# Altium PCB VHF_AMP.PCBDOC (part 5 of 7)
Units mm, origin at the board's own origin, x right, y up, seen from the top; angles counter-clockwise.
Board outline 222.47 x 100.01 mm, 4 copper layers (Top Layer, Int1 (GND), Int2 (PWR), Bottom Layer), stack 1.508 mm thick; 513 components, 284 nets, 1695 pads, 984 vias.
Unrouted connection lines stored in the file: 110.
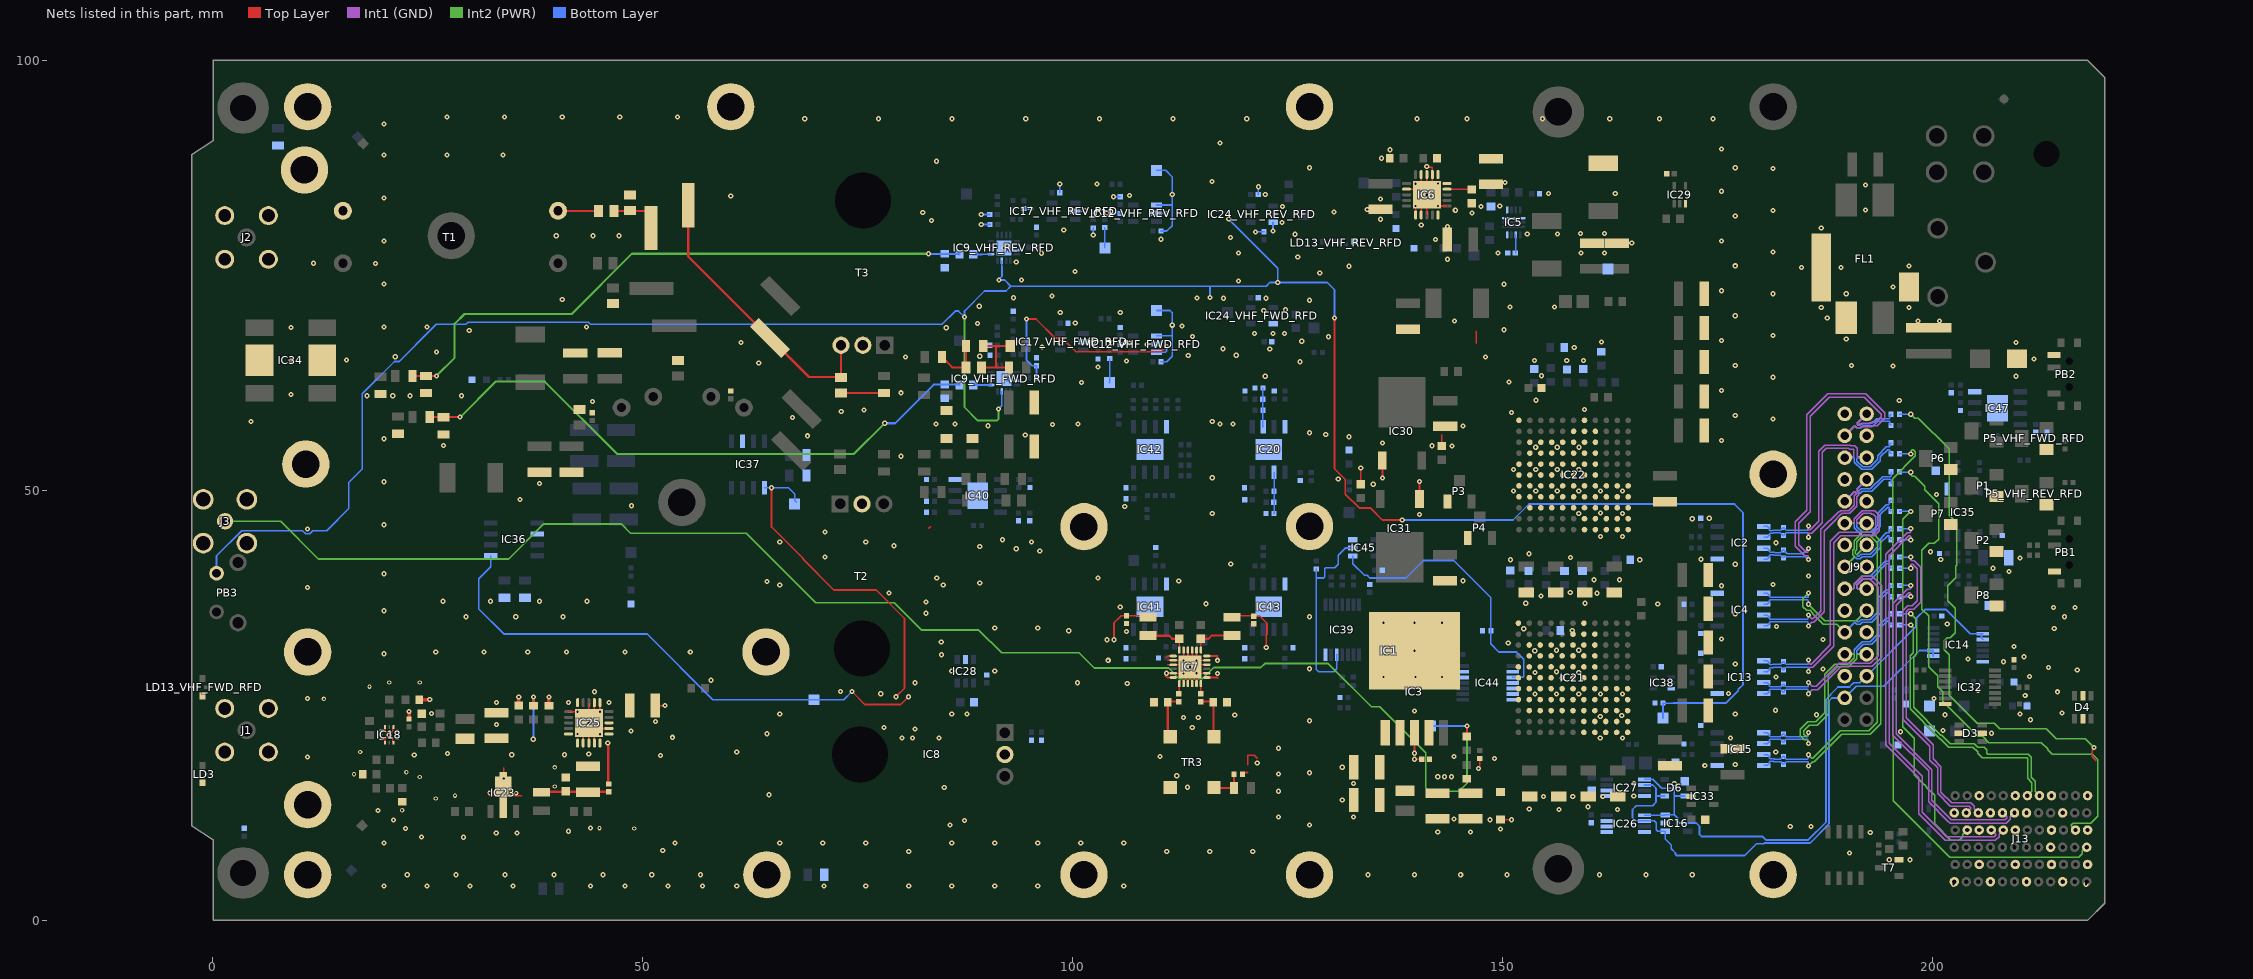
[diagram p5: the nets of this part, all layers, seen from the top]

## Via types
v1: diameter 0.6, hole 0.25, Top Layer to Bottom Layer, tented both sides, 878 vias
v2: diameter 0.6, hole 0.25, Top Layer to Bottom Layer, tented top, 61 vias
v3: diameter 0.5, hole 0.25, Top Layer to Bottom Layer, tented top, 27 vias
v4: diameter 1, hole 0.5, Top Layer to Bottom Layer, tented both sides, 16 vias
v5: diameter 0.5, hole 0.25, Top Layer to Bottom Layer, tented both sides, 2 vias

## Nets (pads, with @x,y where several pads share a name; then routed paths per layer and width w, separated by ;. In a path a pad name is that pad's centre, name@x,y a point inside that pad or via, vN(x,y) a via of type N, cw(c..) or ccw(c..) an arc to the next point about the centre after c; other vN are vias at no path point) (continued)
BP_IO.LVDS_N4: J13.I4 R243.1 | length 47.2
  Int1 (GND) w0.152: v1(197.5,44.24) 197.488,44.252 197.488,44.6 197.399,44.689 197.273,44.689 195.002,42.418 195.002,20.601 198.853,16.75 198.853,12.574 201.71,9.717 205.729,9.717 205.731,9.715 207.188,9.715 207.365,9.892 207.365,10.018 206.89,10.493 J13.I4@206.866,10.493
  Bottom Layer w0.152: R243.1@196.17,44.24 v1(197.5,44.24)
BP_IO.LVDS_N5: J13.K5 R9.1 | length 36.8
  Int1 (GND) w0.152: v1(197.5,40.94) 197.512,40.952 197.512,41.3 197.601,41.389 197.727,41.389 198.244,40.872 198.244,37.151 197.66,36.568 197.132,36.568 196.572,36.008 196.572,23.376 199.698,20.25 199.698,18.635 200.616,17.718 200.616,14.753 202.098,13.271 204.288,13.271 204.465,13.094 204.465,12.968 203.99,12.493 J13.K5@203.966,12.493
  Bottom Layer w0.152: R9.1@196.17,40.94 v1(197.5,40.94)
BP_IO.LVDS_N6: J13.H5 R247.1 | length 39
  Int1 (GND) w0.152: v1(197.5,37.64) 197.488,37.652 197.488,38 197.399,38.089 197.273,38.089 195.8,36.616 195.8,21.703 199.971,17.532 199.971,13.935 202.078,11.827 202.173,11.732 ccw(c202.281,11.84) 202.278,11.688 203.19,11.671 ccw(c203.193,11.823) 203.193,11.671 208.444,11.671 208.665,11.892 208.665,12.018 208.19,12.493 J13.H5@208.166,12.493
  Bottom Layer w0.152: R247.1@196.17,37.64 v1(197.5,37.64)
BP_IO.LVDS_N7: J13.F6 R248.1 | length 32.2
  Int2 (PWR) w0.152: v1(197.5,34.34) v1(197.5,34.34) 197.811,34.03 197.811,31.133 197.454,30.776 197.454,24.603 199.01,23.046 199.01,22.976 200.851,21.135 200.922,21.135 201.905,20.151 204.726,20.151 205.294,19.583 205.294,19.408 205.789,18.913 210.971,18.913 211.095,18.789 211.095,16.492 211.565,16.023 211.565,14.992 J13.F6@211.066,14.493
  Bottom Layer w0.152: R248.1@196.17,34.34 v1(197.5,34.34)
BP_IO.LVDS_P0: J13.D3 R3.1 | length 59.4
  Top Layer w0.152: v1(218.793,20.108) 218.793,20.008 218.58,19.795 218.58,19.045 219.078,18.547
  Int2 (PWR) w0.152: v1(197.5,58.84) 197.949,58.391 198.403,58.391 201.952,54.843 201.952,47.095 202.847,46.2 202.847,41.258 202.747,41.158 202.747,41.133 202.746,39.853 201.808,38.914 201.808,37.151 202.68,36.279 202.68,33.434 202.111,32.865 201.772,32.865 201.389,32.482 201.389,31.463 201.981,30.871 201.981,26.159 205.233,22.907 207.231,22.907 207.467,22.672 207.467,22.66 207.876,22.252 212.924,22.252 213.257,22.252 214.405,21.104 217.796,21.104 v1(218.793,20.108)
  Bottom Layer w0.152: R3.1@196.17,58.84 v1(197.5,58.84)
BP_IO.LVDS_P1: J13.A3 R4.1 | length 69.9
  Int2 (PWR) w0.152: v1(197.5,54.24) 197.583,54.323 197.583,54.6 197.672,54.689 197.798,54.689 198.028,54.459 198.028,53.997 195.402,51.371 195.402,21.535 195.452,21.485 195.452,13.916 202.055,7.313 217.055,7.313 217.467,7.725 217.467,8.018 217.942,8.493 J13.A3@217.966,8.493
  Bottom Layer w0.152: R4.1@196.17,54.24 v1(197.5,54.24)
BP_IO.LVDS_P2: J13.B4 R5.1 | length 63.5
  Int2 (PWR) w0.152: v1(197.5,52.09) 197.583,52.007 197.583,51.73 197.672,51.641 197.964,51.641 199.136,50.469 199.136,50.069 200.778,48.428 200.778,44.336 200.264,43.822 199.588,43.822 198.782,43.016 198.782,36.191 199.582,35.391 199.582,29.469 200.621,28.43 200.621,27.156 201.229,26.548 201.229,25.489 205.295,21.422 205.854,21.422 206.602,20.674 212.66,20.674 213.411,19.922 213.411,19.852 213.948,19.315 218.604,19.315 219.244,18.675 219.244,12.105 218.454,11.315 216.388,11.315 216.167,11.094 216.167,10.968 216.642,10.493 J13.B4@216.666,10.493
  Bottom Layer w0.152: R5.1@196.17,52.14 196.22,52.09 v1(197.5,52.09)
BP_IO.LVDS_P3: J13.K4 R6.1 | length 44.8
  Int2 (PWR) w0.152: v1(197.5,47.54) 196.572,46.612 196.572,22.489 197.907,21.154 197.907,16.924 199.093,15.738 199.111,15.738 199.39,15.459 199.39,15.442 200.277,14.555 200.277,11.214 202.177,9.313 203.155,9.313 203.567,9.725 203.567,10.018 204.042,10.493 J13.K4@204.066,10.493
  Bottom Layer w0.152: R6.1@196.17,47.54 v1(197.5,47.54)
BP_IO.LVDS_P4: J13.H4 R7.1 | length 49.2
  Int1 (GND) w0.152: v1(197.5,45.54) 197.488,45.528 197.488,45.18 197.399,45.091 197.106,45.091 194.6,42.585 194.6,20.434 198.451,16.583 198.451,12.408 201.544,9.315 205.562,9.315 205.564,9.313 207.355,9.313 207.767,9.725 207.767,10.018 208.242,10.493 J13.H4@208.266,10.493
  Bottom Layer w0.152: R7.1@196.17,45.54 v1(197.5,45.54)
BP_IO.LVDS_P5: J13.J5 R8.1 | length 37.5
  Int1 (GND) w0.152: v1(197.5,42.24) 197.512,42.228 197.512,41.88 197.601,41.791 197.894,41.791 198.646,41.039 198.646,36.985 197.827,36.166 197.282,36.166 196.974,35.858 196.974,23.542 200.1,20.416 200.1,18.802 201.018,17.884 201.018,14.92 202.264,13.673 204.455,13.673 204.867,13.261 204.867,12.968 205.342,12.493 J13.J5@205.366,12.493
  Bottom Layer w0.152: R8.1@196.17,42.24 v1(197.5,42.24)
BP_IO.LVDS_P6: J13.G5 R151.1 | length 41
  Int1 (GND) w0.152: v1(197.5,38.94) 197.488,38.928 197.488,38.58 197.399,38.491 197.106,38.491 195.398,36.783 195.398,21.536 199.569,17.366 199.569,13.768 201.794,11.543 201.889,11.448 ccw(c202.281,11.84) 202.271,11.286 203.183,11.269 ccw(c203.193,11.823) 203.193,11.269 208.611,11.269 209.067,11.725 209.067,12.018 209.542,12.493 J13.G5@209.566,12.493
  Bottom Layer w0.152: R151.1@196.17,38.94 v1(197.5,38.94)
BP_IO.LVDS_P7: J13.E6 R92.1 | length 33.9
  Int2 (PWR) w0.152: v1(197.5,35.64) 197.5,35.533 197.607,35.533 198.078,35.062 198.078,34.332 198.213,34.197 198.213,30.966 197.856,30.609 197.856,24.769 199.412,23.213 199.412,23.142 201.018,21.537 201.088,21.537 202.072,20.553 204.892,20.553 205.294,20.151 206.038,20.151 206.346,19.843 206.346,19.404 206.435,19.315 211.138,19.315 211.497,18.955 211.497,16.659 211.967,16.189 211.967,14.992 J13.E6@212.466,14.493
  Bottom Layer w0.152: R92.1@196.17,35.64 v1(197.5,35.64)
CSN_N: IC37.5 R186.2 TP21.1 | length 38.9
  Top Layer w0.2: v1(65.048,50.3) 65.048,45.73 68.71,42.068 68.71,41.985 72.295,38.4 77.199,38.4 80.5,35.099 80.5,27 v1(79.5,26)
  Bottom Layer w0.2: IC37.5@64.214,50.3 v1(65.048,50.3) 67.009,50.3 67.734,49.574 67.734,48.826 TP21.1@67.941,48.62 ; v1@79.475,25.975 v1(79.5,26)
CSN_P: IC36.5 R184.2 TP20.1 | length 62.5
  Top Layer w0.2: v1(74.4,26.6) 75.9,25.1 80.061,25.1 v1(80.961,26)
  Bottom Layer w0.2: IC36.5@32.4,42.395 32.4,41.1 31,39.7 31,36.2 33.9,33.3 50.561,33.3 58.218,25.644 73.444,25.644 v1(74.4,26.6)
DET_RMS_FWD: IC12_VHF_FWD_RFD.1 R32_VHF_FWD_RFD.1 TP31.1 | length 10.4
  Bottom Layer w0.2: IC12_VHF_FWD_RFD.1@109.806,67.961 111.63,67.961 ; TP31.1@109.82,70.9 111.367,70.9 111.63,70.637 v1(111.63,69.2) 111.63,67.961 ; R32_VHF_FWD_RFD.1@110.32,64.944 111,64.944 111.63,65.574 111.63,67.961
DET_RMS_REV: IC12_VHF_REV_RFD.1 R32_VHF_REV_RFD.1 TP32.1 | length 11.2
  Bottom Layer w0.2: IC12_VHF_REV_RFD.1@109.806,83.161 111.63,83.161 ; TP32.1@109.806,87.2 110.86,87.2 111.63,86.43 v1(111.63,84.4) 111.63,83.161 ; R32_VHF_REV_RFD.1@110.32,80.144 111,80.144 111.63,80.774 111.63,83.161
DET_RST: IC1.2 IC9_VHF_FWD_RFD.15 IC9_VHF_REV_RFD.15 IC44.2 PB3.2 R171.2 TP26.1 | length 292.5
  Top Layer w0.2: v1(130.502,70.037) 130.502,52.521 131.763,51.26 131.763,49.559 133.371,47.95 134.644,47.95 136.055,46.539 v1(138.385,46.539)
  Int2 (PWR) w0.2: v1(87.479,70.144) 87.479,59.666 89.041,58.104 91.255,58.104 91.424,58.273 v1(91.424,59.446)
  Bottom Layer w0.2: PB3.2@0.51,40.355 0.51,42.381 3.439,45.31 4.641,45.31 6.54,45.31 10.512,45.31 10.872,44.95 11.328,44.95 11.688,45.31 13.31,45.31 15.886,47.886 15.886,50.908 17.45,52.472 17.45,61.228 21.197,64.975 21.753,64.975 25.55,68.772 25.55,68.801 26.049,69.3 29.522,69.3 29.772,69.55 43.746,69.55 43.996,69.3 84.864,69.3 86.403,70.839 86.783,70.839 v1(87.479,70.144) 87.479,70.838 89.81,73.17 92.302,73.17 92.868,73.736 ; v1(91.424,59.446) 91.819,59.84 IC9_VHF_FWD_RFD.15@91.819,61.489 ; IC9_VHF_REV_RFD.15@91.819,76.689 91.819,76.059 91.85,76.028 91.85,74.91 91.507,74.568 v1(91.507,74.459) 92.144,74.459 92.868,73.736 ; v1(116.03,72.413) 116.03,73.736 ; v1(118.2,81.535) 123.9,75.835 v1(123.9,74.161) ; v1(130.502,70.037) 130.502,73.298 129.639,74.161 v1(123.9,74.161) ; v1(138.385,46.539) 151.248,46.539 153.109,48.4 177,48.4 178,47.4 178,27.397 177.45,26.847 177.45,26.702 176.009,25.26 169.926,25.26 ccw(c169.926,25.06) 169.867,25.251 168.913,25.251 R171.2@168.723,25.26 ; TP26.1@168.7,23.5 R171.2@168.7,25.26 ; 92.868,73.736 116.03,73.736 ; 116.03,73.736 122.555,73.736 122.98,74.161 v1(123.9,74.161)
DET_TRH_FWD: R53_VHF_FWD_RFD.1 TP33.1 | length 2.8
  Bottom Layer w0.2: TP33.1@104.35,62.536 104.36,62.546 R53_VHF_FWD_RFD.1@104.36,65.3
DET_TRH_REV: R53_VHF_REV_RFD.1 TP34.1 | length 2.3
  Bottom Layer w0.2: TP34.1@103.794,78.189 103.8,78.196 R53_VHF_REV_RFD.1@103.8,80.53
DIS_Current: IC39.5 IC45.2 R65.1 | length 22.8
  Bottom Layer w0.2: R65.1@128.39,40.846 128.39,39.8 ; IC39.5@130.757,30.905 130.757,29.257 130.4,28.9 128.65,28.9 128.39,29.16 128.39,39.8 ; IC45.2@132.621,43.3 131.8,43.3 130.945,42.445 130.945,41.386 130.549,40.99 129.491,40.99 129.359,40.858 129.359,39.917 129.242,39.8 128.39,39.8
DIS_DIOT: IC44.4 R45.1 TP11.1
EXT_CTRL: IC44.5 IC44.6 IC44.12 IC44.13
EXT_DIS: IC44.3 IC45.1 R49.2 | length 33.5
  Bottom Layer w0.2: IC45.1@132.621,42.35 132.621,41.473 133.984,40.11 134.3,40.11 134.61,39.8 138.809,39.8 140.85,41.841 144.359,41.841 148.67,37.53 R49.2@148.67,33.671 148.67,32.138 149.608,31.2 151.65,31.2 152.5,30.35 152.5,28.367 152.383,28.25 IC44.3@151.199,28.25
FINE_TUNE_0V_P2V5: J3.1 R43.2 TP25.1 | length 177.1
  Top Layer w0.2: R43.2@145.9,21.385 v1(145.9,22.585)
  Int2 (PWR) w0.2: J3.1@1.5,46.4 7.962,46.4 12.362,42 34.456,42 38.548,46.091 47.572,46.091 48.643,45.02 62.096,45.02 70.184,36.931 79.311,36.931 82.497,33.745 89.149,33.745 91.794,31.1 100.792,31.1 102.562,29.33 111.212,29.33 112.425,28.118 115.181,28.118 116.454,29.39 121.921,29.39 122.381,29.85 129.776,29.85 134.803,24.823 135.773,24.823 141.1,19.495 141.1,15.388 141.488,15 144.963,15 145.9,15.937 v1(145.9,22.585)
  Bottom Layer w0.2: TP25.1@141.695,22.585 v1(145.9,22.585)
GND: B1.1 B2.1 B3.1 B4.1 B5.1 B6.1 B7.1 B8.1 B9.1 B10.1 B11.1 B12.1 B13.1 B14.1 B16.1 B17.1 C2.1 C3.1 C5.1 C6.1 C7.1 C9.2 C10.1 C11.1 C12.1 C13.1 C14.1 C15.1 C18.1 C19.1 C22.1 C23.1 C24.1 C25.2 C26.1 C27.1 C28.1 C29.1 C30.1 C31.1 C32.1 C33.1 C34.1 C35.1 C36.2 C37.1 C38.1 C42.1 C43.1 C44.1 C45.1 C46.1 C47.1 C48.1 C49.1 C50.1 C51.1 C53_VHF_FWD_RFD.1 C53_VHF_REV_RFD.1 C55_VHF_FWD_RFD.2 C55_VHF_REV_RFD.2 C56_VHF_FWD_RFD.1 C56_VHF_REV_RFD.1 C57_VHF_FWD_RFD.1 C57_VHF_REV_RFD.1 C58.1 C59_VHF_FWD_RFD.1 C59_VHF_REV_RFD.1 C60_VHF_FWD_RFD.2 C60_VHF_REV_RFD.2 C61_VHF_FWD_RFD.1 C61_VHF_REV_RFD.1 C62.1 C63.1 C64.1 C65.1 C66.1 C67.1 C68.1 C69.1 C70.1 C71.1 C75.1 C76.1 C77.1 C80.1 C81.1 C82.2 C83.1 C84.1 C85.1 C86.1 C88.1 C89.1 C90.1 C91.1 C92.1 C94.1 C97.1 C101.1 C104.1 C107.1 C111.1 C112.1 C113.1 C114.1 C115.1 C116.1 C117.1 C118.1 C119.1 C120.1 C121.1 C122.1 C123.1 C124.1 C125.1 C126.1 C127.1 C128.1 C129.1 C130.1 C131.1 C132.1 C133.1 C135.1 C136.1 C137.1 C138.1 C139.1 C140.1 C141.1 C142.1 C145.1 C146.1 C153.2 C154.1 C161.1 C162.1 C245_VHF_FWD_RFD.2 C245_VHF_REV_RFD.2 D1.2 D3.2 D3.5 D4.2 D4.5 D6.1 D8.2 FL1.4 IC1.3 IC2.5 IC3.3 IC3.6 IC4.4 IC5.3 IC5.4 IC5.11 IC6.2 IC6.6 IC6.7 IC6.10 IC6.17 IC6.18 IC6.19 IC6.21 IC7.2 IC7.3 IC7.4 IC7.5 IC7.7 IC7.8 IC7.10 IC7.11 IC7.12 IC7.14 IC7.15 IC7.16 IC7.17 IC7.19 IC7.20 IC7.21 IC7.23 IC7.24 IC7.25 IC8.2 IC8.4 IC9_VHF_FWD_RFD.11 IC9_VHF_FWD_RFD.17 IC9_VHF_REV_RFD.11 IC9_VHF_REV_RFD.17 IC12_VHF_FWD_RFD.2 IC12_VHF_REV_RFD.2 IC13.5 IC14.7 IC15.5 IC16.2 IC17_VHF_FWD_RFD.2 IC17_VHF_REV_RFD.2 IC18.1 IC18.3 IC18.4 IC18.6 IC18.10 IC18.12 IC18.13 IC20.4 IC20.9 IC21.A7 IC21.A8 IC21.A9 IC21.A10 IC21.A11 IC21.B7 IC21.B8 IC21.B9 IC21.B10 IC21.B11 IC21.C7 IC21.C8 IC21.C9 IC21.C10 IC21.C11 IC21.D2 IC21.D3 IC21.D4 IC21.D5 IC21.D6 IC21.D7 IC21.D8 IC21.D9 IC21.D10 IC21.D11 IC21.E1 IC21.E2 IC21.E3 IC21.E4 IC21.E5 IC21.E6 IC21.E7 IC21.E8 IC21.E9 IC21.E10 IC21.E11 IC21.F2 IC21.F3 IC21.F4 IC21.F5 IC21.F6 IC21.F7 IC21.F8 IC21.F9 IC21.G3 IC21.G4 IC21.G5 IC21.G6 IC21.G7 IC21.G8 IC21.G9 IC21.H3 IC21.H4 IC21.H5 IC21.H6 IC21.H7 IC21.H8 IC21.H9 IC21.J3 IC21.J4 IC21.J5 IC21.J6 IC21.J7 IC21.J8 IC21.J9 IC21.K3 IC21.K4 IC21.K5 IC21.K6 IC21.K7 IC21.K8 IC21.K9 IC21.L1 IC21.L5 IC21.L6 IC21.L7 IC21.L8 IC22.A7 IC22.A8 IC22.A9 IC22.A10 IC22.A11 IC22.B7 IC22.B8 IC22.B9 IC22.B10 IC22.B11 IC22.C7 IC22.C8 IC22.C9 IC22.C10 IC22.C11 IC22.D2 IC22.D3 IC22.D4 IC22.D5 IC22.D6 IC22.D7 IC22.D8 IC22.D9 IC22.D10 IC22.D11 IC22.E1 IC22.E2 IC22.E3 IC22.E4 IC22.E5 IC22.E6 IC22.E7 IC22.E8 IC22.E9 IC22.E10 IC22.E11 IC22.F2 IC22.F3 IC22.F4 IC22.F5 IC22.F6 IC22.F7 IC22.F8 IC22.F9 IC22.G3 IC22.G4 IC22.G5 IC22.G6 IC22.G7 IC22.G8 IC22.G9 IC22.H3 IC22.H4 IC22.H5 IC22.H6 IC22.H7 IC22.H8 IC22.H9 IC22.J3 IC22.J4 IC22.J5 IC22.J6 IC22.J7 IC22.J8 IC22.J9 IC22.K3 IC22.K4 IC22.K5 IC22.K6 IC22.K7 IC22.K8 IC22.K9 IC22.L1 IC22.L5 IC22.L6 IC22.L7 IC22.L8 IC23.2 IC23.4 IC24_VHF_FWD_RFD.3 IC24_VHF_REV_RFD.3 IC25.2 IC25.6 IC25.7 IC25.10 IC25.17 IC25.18 IC25.19 IC25.21 IC26.4 IC26.5 IC26.6 IC26.7 IC27.4 IC27.5 IC27.6 IC28.2 IC29.3 IC30.1 IC31.1 IC32.7 IC33.2 IC34.2 IC34.3 IC34.6 IC34.7 IC35.1 IC36.2 IC37.2 IC38.3 IC39.7 IC40.4 IC40.9 IC41.4 IC41.9 IC42.4 IC42.9 IC43.4 IC43.9 IC44.7 IC45.3 IC47.4 IC47.9 J1.2 J2.2 J3.2 J9.1 J9.4 J9.7 J9.10 J9.13 J9.16 J9.19 J9.22 J9.25 J13.A2 J13.A4 J13.A6 J13.C1 J13.C5 J13.D2 J13.D4 J13.D6 J13.F1 J13.F5 J13.G2 J13.G4 J13.G6 J13.I1 J13.I5 J13.J2 J13.J4 J13.J6 J13.L1 J13.L5 LD1.1 LD2.1 LD3.1 LD4.1 LD5.1 LD6.1 LD7.1 LD9.1 LD11.1 LD12.1 LD13_VHF_FWD_RFD.1 LD13_VHF_REV_RFD.1 P1.1 P2.1 P3.1 P4.1 P5_VHF_FWD_RFD.1 P5_VHF_REV_RFD.1 P6.1 P7.1 P8.1 PB1.1 PB2.3 R25.2 R27_VHF_FWD_RFD.1 R27_VHF_REV_RFD.1 R29.2 R30.1 R33_VHF_FWD_RFD.1 R33_VHF_REV_RFD.1 R46.1 R49.1 R50.2 R54_VHF_FWD_RFD.1 R54_VHF_REV_RFD.1 R59.2 R69.1 R70.1 R71.1 R74.1 R78.1 R79.1 R84.1 R85.1 R87.1 R93.2 R95.2 R102.1 R103.1 R112_VHF_FWD_RFD.1 R112_VHF_REV_RFD.1 R113_VHF_FWD_RFD.1 R113_VHF_REV_RFD.1 R121.2 R122.2 R124.2 R125.2 R127.1 R131.1 R137.1 R157.1 R158.1 R171.1 R187.2 R188.2 R191.2 R192.2 R197.2 R204.2 R212.2 R214.2 T1.2 T2.2 T3.2 T7.2 TP22.1 TP23.1 TR3.4 | length 104.8
  Top Layer w0.2: IC18.3@19.668,21.064 20.093,21.064 ; IC18.1@19.668,22.064 20.093,22.064 ; IC18.4@20.093,20.639 20.093,21.064 ; IC18.12@20.093,22.489 20.093,22.064 ; IC18.6@21.093,20.639 20.993,20.739 20.993,21.116 20.695,21.414 20.593,21.414 v1(20.593,21.564) ; IC18.10@21.093,22.489 20.993,22.389 20.993,22.013 20.695,21.714 20.593,21.714 v1(20.593,21.564) ; 32.243,14.495 v3(33.907,14.495) 36.002,14.495 ; v3(33.907,16.478) 33.907,17.741 ; 41.443,24.259 v1(42.493,24.259) ; IC25.17@43.143,20.609 IC25.21@43.143,21.39 ; IC25.18@43.793,20.609 v1(43.793,22.959) ; IC25.21@43.793,24.581 43.793,25.309 ; IC25.19@44.443,20.609 IC25.21@44.443,21.39 ; IC25.21@44.443,24.581 IC25.7@44.443,25.309 ; v1(45.093,24.259) IC25.6@45.093,25.309 ; IC25.21@45.363,22.309 IC25.2@46.143,22.309 ; C11.1@51.544,24.959 v1(52.643,24.959) ; 83.329,45.578 83.521,45.77 ; v1@110.758,28.73 IC7.23@111.758,28.73 IC7.25@112.395,28.73 ; 110.858,28.42 111.048,28.23 IC7.24@111.758,28.23 ; 110.964,30.573 111.12,30.73 IC7.19@111.758,30.73 ; 111.12,29.73 IC7.21@111.758,29.73 IC7.25@112.395,29.73 ; 111.12,30.23 IC7.20@111.758,30.23 v1(114.458,30.23) ; IC7.2@112.958,27.53 IC7.25@112.958,28.167 ; IC7.25@112.958,30.793 IC7.17@112.958,31.43 ; IC7.3@113.458,27.53 IC7.25@113.458,28.167 ; IC7.25@113.458,30.793 IC7.16@113.458,31.43 ; IC7.25@113.946,30.797 113.946,31.43 IC7.15@113.958,31.43 ; IC7.4@113.958,27.53 IC7.25@113.958,28.167 ; IC7.5@114.458,27.53 IC7.25@114.458,28.167 ; IC7.25@114.458,30.793 IC7.14@114.458,31.43 ; IC7.7@115.658,28.23 116.86,28.23 cw(c116.86,28.182) 116.908,28.182 ; IC7.8@115.658,28.73 v1(114.458,28.73) cw(c114.458,29.48) v1(113.708,29.48) IC7.25@113.958,29.73 ; IC7.10@115.658,29.73 IC7.25@113.958,29.73 ; IC7.11@115.658,30.23 v1(114.458,30.23) ; IC7.12@115.658,30.73 116.908,30.73 ; C19.1@119.798,16.98 C19.1@119.998,17.18 ; C19.1@120.083,17.18 C19.1@119.998,17.18 ; 120.408,17.198 120.016,17.198 C19.1@119.998,17.18 ; 120.408,18.08 120.408,19.18 121.169,19.18 121.519,18.83 ; C97.1@133.55,50.7 v1(133.55,52.6) ; v1(136.069,51.431) IC30.1@136.069,53.45 ; IC6.2@138.882,85.014 IC6.21@140.582,85.014 ; v1(139.8,18.73) C25.2@140.65,18.73 ; v1(139.8,19.429) IC3.3@139.8,21.8 ; IC6.6@139.932,82.014 139.932,84.364 IC6.21@140.582,84.364 ; IC31.1@140.38,49 v1(140.38,51.005) ; IC6.7@140.582,82.014 IC6.21@140.582,84.364 ; IC6.19@140.582,86.714 IC6.21@140.582,85.014 ; 141.232,82.014 IC6.21@141.232,83.064 ; IC6.18@141.232,86.714 IC6.21@141.232,85.014 ; v1@141.348,87.552 141.882,87.552 IC6.17@141.882,86.714 141.882,84.364 v1(141.232,84.364) ; C68.1@142.98,55.16 142.98,56.475 ; 143.582,83.064 v1(142.532,83.064) IC6.21@141.232,83.064 ; v1(147.25,17.65) 147.25,17.758 147.4,17.908 R46.1@147.4,18.83 ; D8.2@149.8,11.7 150.78,11.7 ; 20.093,21.064 v1(20.593,21.564) ; 20.093,22.064 v1(20.593,21.564) ; IC7.25@113.958,29.73 v1(114.458,30.23) ; IC6.21@140.582,84.364 IC6.21@140.582,85.014 ; IC6.21@140.582,84.364 v1(141.232,84.364) ; IC6.21@140.582,85.014 IC6.21@141.232,85.014 ; IC6.21@141.232,83.064 v1(141.232,84.364) ; v1(141.232,84.364) IC6.21@141.232,85.014
  Top Layer w0.3: IC25.21@43.143,21.39 cw(c45.363,21.39) v1(43.793,22.959) ; IC25.21@44.443,21.39 ccw(c42.224,21.39) v1(43.793,22.959) ; IC25.21@45.363,22.309 cw(c45.363,24.529) v1(43.793,22.959)
  Top Layer w0.4: C89.1@22.893,23.414 v1(22.893,24.264) ; R95.2@24.093,25.664 v1(25.293,25.664) ; C77.1@35.643,24.959 v1(35.643,25.959) ; R131.1@39.163,24.959 v1(39.163,25.959)
  Bottom Layer w0.2: v1(89.424,80.9) C59_VHF_REV_RFD.1@90.45,80.9 ; v1(89.424,82.061) C60_VHF_REV_RFD.2@90.406,82.061 ; v1(92.069,62.989) 92.319,62.739 IC9_VHF_FWD_RFD.11@93.569,62.739 ; v1(92.069,78.189) 92.319,77.939 IC9_VHF_REV_RFD.11@93.569,77.939 ; C55_VHF_REV_RFD.2@94.4,82.774 v1(95.175,82.774) ; C57_VHF_REV_RFD.1@98.55,84.6 v1(98.55,85.6) ; IC17_VHF_REV_RFD.2@100.344,82.439 101.169,82.439 101.19,82.461 101.462,82.461 v1(101.5,82.5) ; v1(102.444,79.689) R54_VHF_REV_RFD.1@102.444,80.519 ; v1(104.033,82.211) 104.054,82.19 105.58,82.19 R33_VHF_REV_RFD.1@105.6,82.17 ; v1(104.815,84.124) C61_VHF_REV_RFD.1@105.595,84.124 ; IC12_VHF_REV_RFD.2@109.806,82.211 110.914,82.211 v1(110.925,82.2) ; v1(121.32,80.05) C56_VHF_REV_RFD.1@122.306,80.05 ; C245_VHF_REV_RFD.2@121.65,84.4 v1(121.65,85.294) ; v1(123.356,80.144) IC24_VHF_REV_RFD.3@123.356,81.161
  other v1: 20,4 25,4 30,4 35,4 44,4 48,4 53,4 57,4 61,4 71.15,4 76,4 81,4 86,4 91,4 96,4 106,4 202.488,4.2 217.879,4.2 22.686,5.3 28.371,5.3 34.057,5.3 39.743,5.3 45.429,5.3 51.114,5.3 56.8,5.3 134.4,5.3 139.786,5.3 145.171,5.3 150.557,5.3 155.943,5.3 161.329,5.3 166.714,5.3 172.1,5.3 195,7.05 197.42,7.05 190.4,7.83 81,8 111,8 116,8 121,8 52.4,8.131 20,9 53.8,9 66,9 71,9 76,9 86,9 91,9 96,9 101,9 106,9 29.235,9.665 24.35,9.7 33.038,10.155 35.45,10.155 142.5,10.288 146.3,10.288 41.419,10.352 149.8,10.6 22.493,10.664 44,10.739 85.8,11.1 127.6,11.1 87.47,11.6 21.103,11.664 148.6,11.7 151.1,11.7 144.4,11.8 124,12 132.7,12 19.293,12.764 156.6,12.9 163.4,12.9 153.15,12.95 159.995,13.21 131.4,14 154.8,14.4 158.2,14.4 161.7,14.4 165.3,14.445 64.728,14.601 124,15 85.125,15.462 113.399,15.48 170.009,15.885 132.7,15.9 165.322,15.925 112.153,16.807 124,17 127.6,17.15 131.4,17.8 173.56,18.004 177.1,18.1 121.519,18.293 149.108,18.83 11.1,19 144.4,19.034 110.208,19.048 52.146,19.148 23.493,19.226 34.836,19.259 40.96,19.259 43.793,19.339 27.383,19.391 61,19.57 181.808,19.566 124,20 80.198,21.2 81.421,21.2 84.5,21.2 161.4,21.2 164,21.2 176.55,21.2 53.545,21.277 45.093,21.63 42.493,21.659 64.5,21.7 206.912,21.75 196.33,21.919 48.693,22.015 201.235,22.063 81.718,22.25 78.125,22.4 113.958,22.424 33.043,22.778 51.544,23.134 127.6,23.2 211.43,23.32 112.958,23.58 114.661,23.58 161.4,23.7 163.9,23.8 118.908,23.88 186.538,23.898 201.485,23.898 66,24 86,24 87.756,24 177.1,24 210.22,24.004 25.493,24.064 215.088,24.122 139.79,24.35 181.793,24.431 33.043,25.309 41.432,25.309 46.143,25.309 11.1,25.8 200.215,25.8 210.808,26.131 153.8,26.3 156.3,26.3 158.9,26.3 161.429,26.3 164,26.3 77.733,26.347 176.295,26.364 44.443,26.574 214.574,26.568 73.067,26.599 205.331,26.744 106.408,27.53 100.628,27.618 81.718,27.631 58,27.915 136.2,28.3 139.9,28.3 143,28.3 181.833,28.31 211.305,28.355 110.964,28.73 112.958,28.717 116.908,28.717 153.8,28.8 158.9,28.8 156.3,28.9 86,29 91,29 216.87,29.1 187.32,29.202 127.6,29.25 213.529,29.4 177.1,29.8 208.28,30.059 104.185,30.23 112.958,30.23 116.908,30.23 204.18,30.402 210.67,30.65 84.805,30.883 20,31 26,31.2 31.6,31.2 36.7,31.2 41.2,31.2 48,31.2 55.6,31.2 139.8,31.35 153.785,31.35 156.3,31.4 158.9,31.4 209.52,31.847 150.71,32.26 84.77,32.37 187.32,32.66 175.5,32.7 106.32,33.59 158.14,33.7 152.5,33.9 214.185,33.913 91,34 96,34 181.881,34.163 201.752,34.45 136.2,34.6 139.8,34.6 143,34.6 29.507,35.3 35.3,35.3 40.8,35.3 127.6,35.3 215.4,35.3 177.1,35.6 83,35.7 20,36 214.1,36.383 216.612,36.383 105.59,36.435 168.083,36.781 115.54,36.8 152.745,36.871 159.639,36.871 83,37 26.85,37.1 32.375,37.1 38.067,37.1 43.6,37.1 154.5,37.7 161.025,38.036 78.699,38.073 157.918,38.134 11.1,38.7 175.5,38.9 66,39 85,39 181.5,39.028 89.26,39.211 64.5,39.4 112.389,39.445 145.46,39.484 160.66,39.6 163.629,39.6 84.245,39.8 103.004,39.8 185.612,40.028 20,40.3 208.928,40.557 207.07,40.94 177.1,41.4 118.437,41.443 150.955,41.926 166,41.926 200.996,41.95 173.1,41.989 210.19,42.14 157.924,42.18 71.275,42.26 153.111,42.63 199.782,42.856 96.23,42.946 93.5,43.201 89.26,43.457 79.289,43.55 181.833,43.894 95.281,43.97 66,44 76,44 91.91,44.249 161.429,44.633 164.007,44.633 71.264,45.142 11.1,45.5 20,46 172.1,46.7 174.075,46.75 140.38,47.177 116.285,47.291 158.9,47.3 164.007,47.3 161.429,47.363 106.113,48.1 48.77,48.2 35.8,48.919 200.5,49.5 151.3,49.9 153.9,49.9 156.4,49.9 158.9,49.9 161.429,49.9 164.007,49.9 135,50.7 38.067,50.8 20,51 130.945,51.3 116.285,51.455 151.3,52.4 153.9,52.4 156.4,52.4 158.9,52.4 80.089,53.955 156.4,55 158.914,55 153.892,55.01 144.166,55.16 141.85,55.185 26.9,55.228 136.069,55.496 175.5,55.8 20,56 132.2,56.223 69.231,56.334 94.536,56.412 129.491,56.501 127.6,56.7 145.432,57.47 90.205,57.5 97.696,57.67 84.181,57.709 86.355,57.709 100.69,57.709 117.2,57.7 118.7,57.7 4.5,58 116.285,58 181.5,58.3 67.473,58.471 177.1,58.7 151.1,59.045 73.156,59.146 75.81,59.346 159.57,59.4 44.228,60.321 196.17,60.431 153.933,60.466 18,61 21,61 23,61 29,61 9.15,61.15 80.089,61.334 175.5,61.6 150.8,62.583 181.5,63.15 209.749,63.266 154.56,63.325 103.004,64.348 195.44,64.445 177.1,64.5 190.6,64.503 63.56,64.8 9.15,65.087 153.74,65.11 157.51,65.11 159.44,65.11 15.634,65.15 211.838,65.283 80.603,65.496 148.04,65.51 21.286,65.525 89.26,65.593 119.071,65.701 26.086,66.08 117.525,66.459 122.975,66.436 158.37,66.6 96.488,66.661 108.7,66.968 106.668,67.126 98.611,67.15 104.611,67.15 61.485,67.196 209.749,67.202 161.54,67.239 102.484,67.276 175.5,67.4 190,67.598 129.814,67.861 114,67.9 181.5,68 124.698,68.226 121.2,68.25 123.356,68.25 29.887,68.6 150.211,68.66 9.15,68.91 85.35,68.909 20,69 25,69 43.518,69 89.003,69.4 100.363,69.464 144.441,69.684 198.349,69.7 200.85,69.7 187.8,70.05 177.1,70.3 98.611,70.691 105.586,70.691 122.269,70.9 187.1,71.27 197.3,71.27 150.918,71.31 156.1,71.31 89.198,71.4 127.6,72.1 40.7,72.2 122.542,72.324 93.157,72.38 97.644,72.6 181.5,72.85 190,72.852 175.5,73.2 195.44,73.65 150.211,73.96 20,74 119.345,74.341 94.095,74.438 100.344,75.45 184.8,75.897 189.386,75.897 132.2,76.045 197.3,76.084 177.1,76.1 19,76.377 11.78,76.4 93.5,76.545 143.632,76.871 96.445,77.562 119.345,77.586 149.524,77.6 159.165,77.6 161.91,77.6 181.5,77.7 165.055,78.75 20,79 175.5,79 142.241,79.15 110.32,79.194 118.427,79.405 40.018,79.6 44.3,79.6 47.3,79.6 152.91,79.796 156.44,79.796 159.115,79.874 161.91,79.874 187.1,80.5 143.632,80.676 140.582,80.855 124.384,81.147 83.65,81.357 135.832,81.523 177.1,81.9 146.475,82.258 82.629,82.3 130.431,82.365 144.55,82.558 181.5,82.55 192.245,82.6 134.3,82.654 124.444,83 147.53,83 139.932,83.064 149.718,83.064 135.852,83.869 20,84 60.3,84.2 122.456,84.4 155.39,84.517 163.138,84.517 175.492,84.772 192.245,85.5 139.932,85.648 142.532,85.681 150.318,85.797 116.25,85.9 181.5,87.4 127.6,87.5 177.1,87.5 141.223,87.639 135.982,88.614 27.3,88.987 20,89 33.8,89 136.972,89.6 175.5,89.7 117.2,90.4 20,92.6 68.9,93.2 77.467,93.2 86.033,93.2 94.6,93.2 103.167,93.2 111.733,93.2 120.3,93.2 140.1,93.2 145.9,93.2 154.7,93.2 162.5,93.2 168.3,93.2 174.5,93.2 27.3,93.4 34,93.4 40.7,93.4 47.4,93.4 54.1,93.4
  other v2: 192.8,10.2 183.5,10.9 185.9,10.9 104.068,32.618 99.602,33.672 101.073,62.536 122.456,63.26 126.486,64.944 106.331,65.039 113.49,65.673 126.687,67.324 112.766,69.117 124.789,71 117.608,72.324 114.493,72.37 128.785,75.267 126.227,77.116 125.912,79.766 99.012,80.258 106.668,84.274 102.904,85.6 84.211,88.268
  other v3: 49.074,10.685 45.043,10.714 22.093,12.794 25.993,14.156 28.238,14.495 35.351,14.785 32.243,14.819 39.843,15.55 24.145,16.664 16.496,16.989 22.581,17.222 39.843,17.785 17.204,19.564 12.991,25.75 18.293,27.174 20.593,27.65 24.145,27.65
I2C_SCL0: D6.3 IC14.9 IC14.10 IC16.1 IC26.2 IC27.2 J9.27 | length 65.1
  Bottom Layer w0.2: IC27.2@166.553,15.737 167.503,15.737 167.886,15.354 167.886,13.715 167.503,13.332 165.6,13.332 165.15,12.882 165.15,11.921 165.502,11.568 IC26.2@166.555,11.568 167.686,11.568 167.9,11.354 167.9,10.546 168.083,10.362 IC16.1@168.953,10.362 168.953,9.458 169.658,8.753 169.658,8.325 170.153,7.83 170.153,7.65 170.27,7.533 178.198,7.533 179.565,8.9 180.392,8.9 180.489,8.997 185.8,8.997 187.9,11.098 187.9,11.168 188,11.268 188,17.428 187.996,17.431 187.996,25.504 188.352,25.86 J9.27@189.83,25.86 191.187,27.217 194.369,27.217 198.522,31.37 IC14.10@200.095,31.37 IC14.9@200.095,30.72 ; 168.004,14.462 D6.3@168.903,14.462
I2C_SDA0: D6.2 IC14.2 IC14.3 IC16.3 IC26.1 IC27.1 J9.26 | length 71.3
  Bottom Layer w0.2: IC27.1@166.553,16.387 167.503,16.387 168.55,15.34 169.8,15.34 170.002,15.138 170.002,14.462 ; IC26.1@166.555,12.218 168.909,12.218 IC16.3@168.953,12.262 170.002,12.262 ; D6.2@171.203,14.462 170.002,14.462 ; IC14.3@205.895,32.67 205.731,32.834 205.731,33.195 IC14.2@205.856,33.32 ; IC14.2@205.895,33.32 IC14.2@205.856,33.32 ; 170.002,12.262 170.406,11.859 170.406,11.512 170.605,11.312 172.549,11.312 172.95,10.911 172.95,9.976 173.171,9.755 180.227,9.755 180.634,9.347 185.584,9.347 187.646,11.41 187.646,15.306 187.65,15.31 187.65,17.283 187.646,17.286 187.646,25.649 188.177,26.179 188.177,26.25 189.05,27.123 190.373,27.123 190.867,27.617 191.587,27.617 J9.26@192.37,28.4 198.2,34.23 198.2,35.168 199.164,36.131 201.615,36.131 204.426,33.32 IC14.2@205.856,33.32 ; 170.002,12.262 170.002,14.462
LVDS0_N: IC2.4 J9.3 R36.2 R235.2 | length 47.9
  Int1 (GND) w0.152: v1(185.6,41.95) 185.588,41.962 185.588,42.31 185.499,42.399 185.206,42.399 184.098,43.507 184.098,46.354 185.4,47.656 185.4,58.769 187.833,61.202 192.285,61.202 194.48,59.007 194.48,58.373 193.609,57.502 193.085,57.502 192.999,57.416 191.763,57.416 191.61,57.263 191.234,57.263 191.056,57.44 190.93,57.44 J9.3@189.83,56.34
  Bottom Layer w0.152: IC2.4@180.4,41.995 180.83,41.995 181.054,42.219 181.054,42.39 181.143,42.479 181.561,42.479 181.591,42.449 182.377,42.449 182.466,42.36 182.466,42.344 182.68,42.13 R36.2@182.7,42.13 182.868,42.298 185.252,42.298 v1(185.6,41.95) ; J9.3@189.83,56.34 190.93,57.44 191.056,57.44 191.234,57.263 191.771,57.263 192.008,57.5 193.118,57.5 193.657,58.039 194.977,58.039 195.066,57.95 195.066,57.704 R235.2@195.23,57.54
LVDS0_P: IC2.3 J9.2 R3.2 R36.1 | length 45
  Int1 (GND) w0.152: v1(185.6,43.25) 185.588,43.238 185.588,42.89 185.499,42.801 185.373,42.801 184.5,43.674 184.5,46.188 185.802,47.49 185.802,58.602 188,60.8 192.118,60.8 194.078,58.84 194.078,58.539 193.443,57.904 192.919,57.904 192.733,57.718 191.638,57.718 191.485,57.565 191.359,57.565 191.27,57.654 191.27,57.78 J9.2@192.37,58.88
  Bottom Layer w0.152: IC2.3@180.4,43.265 180.83,43.265 181.054,43.041 181.054,42.87 181.143,42.781 181.686,42.781 181.716,42.751 182.377,42.751 182.466,42.84 182.466,42.856 182.68,43.07 R36.1@182.7,43.07 182.72,43.07 182.934,42.856 182.934,42.836 183.17,42.6 184.95,42.6 v1(185.6,43.25) ; J9.2@192.37,58.88 191.27,57.78 191.27,57.654 191.359,57.565 191.646,57.565 191.883,57.802 192.993,57.802 193.532,58.341 194.977,58.341 195.066,58.43 195.066,58.676 R3.2@195.23,58.84
LVDS1_N: IC2.1 J9.6 R34.1 R236.2 | length 30.8
  Int1 (GND) w0.152: v1(185.6,45.85) 185.612,45.838 185.612,45.49 185.701,45.401 185.827,45.401 186.8,46.374 186.8,54.567 187.498,55.264 190.459,55.264 190.521,55.202 190.977,55.202 191.302,54.877 191.302,53.889 192.281,53.889 J9.6@192.37,53.8
  Bottom Layer w0.152: IC2.1@180.4,45.805 180.83,45.805 181.054,45.581 181.054,45.41 181.143,45.321 181.384,45.321 181.414,45.351 182.377,45.351 182.466,45.44 182.466,45.456 182.68,45.67 R34.1@182.7,45.67 182.72,45.67 182.934,45.456 182.934,45.44 183.023,45.351 185.511,45.351 185.6,45.44 v1(185.6,45.85) ; J9.6@192.37,53.8 191.34,53.8 191.251,53.711 191.251,53.395 191.924,52.722 192.817,52.722 193.679,53.584 193.679,54.038 194.681,55.041 194.977,55.041 195.066,55.13 195.066,55.376 R236.2@195.23,55.54
LVDS1_P: IC2.2 J9.5 R4.2 R34.2 | length 30.6
  Int1 (GND) w0.152: v1(185.6,44.55) 185.612,44.562 185.612,44.91 185.701,44.999 185.994,44.999 187.202,46.207 187.202,54.4 187.664,54.862 189.368,54.862 189.384,54.878 190.277,54.878 190.355,54.8 190.811,54.8 190.9,54.711 190.9,53.889 189.919,53.889 J9.5@189.83,53.8
  Bottom Layer w0.152: IC2.2@180.4,44.535 180.83,44.535 181.054,44.759 181.054,44.93 181.143,45.019 181.509,45.019 181.539,45.049 182.377,45.049 182.466,44.96 182.466,44.944 182.68,44.73 R34.2@182.7,44.73 182.72,44.73 182.934,44.944 182.934,44.96 183.023,45.049 185.511,45.049 185.6,44.96 v1(185.6,44.55) ; J9.5@189.83,53.8 190.86,53.8 190.949,53.711 190.949,53.269 191.798,52.42 192.942,52.42 193.981,53.459 193.981,53.913 194.807,54.739 194.977,54.739 195.066,54.65 195.066,54.404 R4.2@195.23,54.24
LVDS2_N: IC4.7 J9.9 R241.2 | length 33
  Top Layer w0.152: v1@185.6,35.479 v1(185.6,35.511)
  Int1 (GND) w0.152: v1(185.6,35.511) 185.6,35.464 186.002,35.062 186.127,35.062 187.072,36.007 187.028,36.051 187.028,45.452 189.108,47.532 189.233,47.532 189.343,47.642 190.277,47.642 190.908,48.274 190.908,49.368 191.145,49.605 191.145,49.731 191.056,49.82 190.93,49.82 J9.9@189.83,48.72
  Bottom Layer w0.152: IC4.7@180.4,35.496 180.83,35.496 181.054,35.272 181.054,35.102 181.143,35.012 185.511,35.012 185.6,35.102 v1(185.6,35.511) ; J9.9@189.83,48.72 190.93,49.82 191.056,49.82 191.234,49.643 191.61,49.643 191.847,49.88 192.942,49.88 194.351,51.289 195.141,51.289 195.23,51.2 R241.2@195.23,50.74
LVDS2_P: IC4.8 J9.8 R5.2 | length 33.5
  Int1 (GND) w0.152: v1(185.6,34.211) 185.6,34.259 186.002,34.66 186.244,34.66 187.439,35.855 187.439,45.162 ; 187.438,45.163 187.438,45.176 187.438,45.239 188.875,46.676 cw(c189.83,46.18) 189.334,47.135 189.539,47.34 190.402,47.34 191.21,48.148 191.21,49.243 191.447,49.48 191.447,49.856 191.27,50.034 191.27,50.16 J9.8@192.37,51.26
  Bottom Layer w0.152: IC4.8@180.4,34.226 180.83,34.226 181.054,34.45 181.054,34.621 181.143,34.71 185.511,34.71 185.6,34.621 v1(185.6,34.211) ; J9.8@192.37,51.26 191.27,50.16 191.27,50.034 191.359,49.945 191.485,49.945 191.722,50.182 192.817,50.182 194.226,51.591 195.141,51.591 195.23,51.68 R5.2@195.23,52.14
LVDS3_N: IC13.1 J9.12 R38.1 R242.2 | length 41.8
  Int1 (GND) w0.152: v1(185.6,30.25) 185.686,30.164 185.686,29.92 185.804,29.801 185.93,29.801 188.159,32.03 188.159,44.059 189.204,45.104 193.102,45.104 193.443,45.445 193.443,45.728 193.448,45.734 193.448,46.929 193.135,47.242 192.959,47.242 192.859,47.342 192.008,47.342 191.251,46.586 191.251,46.269 191.34,46.18 J9.12@192.37,46.18
  Bottom Layer w0.152: IC13.1@180.4,30.173 180.83,30.173 181.054,29.949 181.054,29.778 181.143,29.689 181.368,29.689 181.43,29.751 182.377,29.751 182.466,29.84 182.466,29.856 182.68,30.07 R38.1@182.7,30.07 182.72,30.07 182.934,29.856 182.934,29.84 183.023,29.751 185.511,29.751 185.6,29.84 v1(185.6,30.25) ; J9.12@192.37,46.18 191.34,46.18 191.251,46.091 191.251,45.775 191.924,45.102 192.817,45.102 193.676,45.962 193.676,47.341 194.676,48.341 194.927,48.341 195.016,48.43 195.016,48.626 R242.2@195.23,48.84
LVDS3_P: IC13.2 J9.11 R6.2 R38.2 | length 44.1
  Top Layer w0.152: v1(185.6,28.95) v1@185.6,28.982
  Int1 (GND) w0.152: v1(185.6,28.95) 185.686,29.036 185.686,29.28 185.804,29.399 186.097,29.399 188.561,31.863 188.561,43.892 189.384,44.716 190.276,44.716 190.29,44.702 191.91,44.702 191.924,44.716 192.816,44.716 192.83,44.702 193.268,44.702 193.845,45.279 193.845,45.562 193.85,45.567 193.85,47.096 193.302,47.644 191.882,47.644 190.949,46.711 190.949,46.269 190.86,46.18 J9.11@189.83,46.18
  Bottom Layer w0.152: IC13.2@180.4,28.903 180.83,28.903 181.054,29.127 181.054,29.298 181.143,29.387 181.493,29.387 181.555,29.449 182.377,29.449 182.466,29.36 182.466,29.344 182.68,29.13 R38.2@182.7,29.13 182.72,29.13 182.934,29.344 182.934,29.36 183.023,29.449 185.511,29.449 185.6,29.36 v1(185.6,28.95) ; J9.11@189.83,46.18 190.86,46.18 190.949,46.091 190.949,45.649 191.798,44.8 192.942,44.8 193.978,45.836 193.978,47.216 194.801,48.039 194.927,48.039 195.016,47.95 195.016,47.754 R6.2@195.23,47.54
LVDS4_N: IC15.4 J9.15 R82.2 R243.2 | length 53.2
  Int2 (PWR) w0.152: v1(185.6,17.95) 186.112,18.462 186.278,18.462 189.469,21.652 192.792,21.652 194.01,22.87 194.01,44.093 192.999,45.104 191.882,45.104 190.906,44.128 190.906,43.194 190.753,43.041 190.753,42.504 190.93,42.326 190.93,42.2 J9.15@189.83,41.1
  Bottom Layer w0.152: IC15.4@180.4,18.004 180.83,18.004 181.054,18.228 181.054,18.399 181.143,18.488 181.521,18.488 181.561,18.449 182.377,18.449 182.466,18.36 182.466,18.344 182.68,18.13 R82.2@182.7,18.13 182.72,18.13 182.934,18.344 182.934,18.36 183.023,18.449 184.176,18.449 185.511,18.449 185.6,18.36 v1(185.6,17.95) ; J9.15@189.83,41.1 190.93,42.2 191.056,42.2 191.234,42.023 191.61,42.023 191.847,42.26 192.942,42.26 193.978,43.296 193.978,43.916 194.801,44.739 194.927,44.739 195.016,44.65 195.016,44.454 R243.2@195.23,44.24
LVDS4_P: IC15.3 J9.14 R7.2 R82.1 | length 50.9
  Int2 (PWR) w0.152: v1(185.6,19.25) 185.986,18.864 186.112,18.864 189.302,22.054 192.626,22.054 193.608,23.036 193.608,43.927 192.733,44.802 192.008,44.802 191.208,44.003 191.208,43.069 191.055,42.916 191.055,42.629 191.144,42.54 191.27,42.54 J9.14@192.37,43.64
  Bottom Layer w0.152: IC15.3@180.4,19.274 180.83,19.274 181.054,19.05 181.054,18.88 181.143,18.79 181.646,18.79 181.686,18.751 182.377,18.751 182.466,18.84 182.466,18.856 182.68,19.07 R82.1@182.7,19.07 182.72,19.07 182.934,18.856 182.934,18.84 183.023,18.751 184.301,18.751 185.511,18.751 185.6,18.84 v1(185.6,19.25) ; J9.14@192.37,43.64 191.27,42.54 191.27,42.414 191.359,42.325 191.485,42.325 191.722,42.562 192.817,42.562 193.676,43.422 193.676,44.041 194.676,45.041 194.927,45.041 195.016,45.13 195.016,45.326 R7.2@195.23,45.54
LVDS5_N: IC13.3 J9.18 R9.2 R62.1 | length 35.4
  Int1 (GND) w0.152: v1(185.6,27.65) 186.049,27.201 186.541,27.201 189.204,29.864 192.816,29.864 193.727,30.775 193.727,38.728 192.733,39.722 192.008,39.722 191.251,38.966 191.251,38.649 191.34,38.56 J9.18@192.37,38.56
  Bottom Layer w0.152: IC13.3@180.4,27.633 180.83,27.633 181.054,27.409 181.054,27.238 181.143,27.149 181.398,27.149 181.4,27.151 182.377,27.151 182.466,27.24 182.466,27.256 182.68,27.47 R62.1@182.7,27.47 182.72,27.47 182.934,27.256 182.934,27.24 183.023,27.151 185.511,27.151 185.6,27.24 v1(185.6,27.65) ; J9.18@192.37,38.56 191.34,38.56 191.251,38.649 191.251,38.966 192.008,39.722 192.941,39.722 194.658,41.439 194.927,41.439 195.016,41.35 195.016,41.154 R9.2@195.23,40.94
LVDS5_P: IC13.4 J9.17 R8.2 R62.2 | length 37.7
  Int1 (GND) w0.152: v1(185.6,26.35) 186.049,26.799 186.707,26.799 189.434,29.526 193.046,29.526 194.129,30.609 194.129,38.894 192.999,40.024 191.882,40.024 190.949,39.091 190.949,38.649 190.86,38.56 J9.17@189.83,38.56
  Bottom Layer w0.152: IC13.4@180.4,26.363 180.83,26.363 181.054,26.587 181.054,26.758 181.143,26.847 181.523,26.847 181.525,26.849 182.377,26.849 182.466,26.76 182.466,26.744 182.68,26.53 R62.2@182.7,26.53 182.72,26.53 182.934,26.744 182.934,26.76 183.023,26.849 185.511,26.849 185.6,26.76 v1(185.6,26.35) ; J9.17@189.83,38.56 190.86,38.56 190.949,38.649 190.949,39.091 191.882,40.024 192.816,40.024 194.533,41.741 194.927,41.741 195.016,41.83 195.016,42.026 R8.2@195.23,42.24
LVDS6_N: IC4.5 J9.21 R247.2 | length 22.7
  Int2 (PWR) w0.152: v1(185.6,38.051) 184.935,37.387 184.935,36.488 185.386,36.037 185.818,36.037 186.126,35.729 186.126,35.659 186.999,34.786 187.346,34.438 188.872,34.438 J9.21@189.83,33.48
  Bottom Layer w0.152: IC4.5@180.4,38.036 180.83,38.036 181.054,37.812 181.054,37.642 181.143,37.552 185.511,37.552 185.6,37.642 v1(185.6,38.051) ; J9.21@189.83,33.48 190.93,34.58 191.056,34.58 191.234,34.403 191.61,34.403 191.847,34.64 192.942,34.64 193.978,35.676 193.978,37.316 194.801,38.139 194.927,38.139 195.016,38.05 195.016,37.854 R247.2@195.23,37.64
LVDS6_P: IC4.6 J9.20 R151.2 | length 22.5
  Int2 (PWR) w0.152: v1(185.6,36.751) 185.602,36.751 187.238,35.115 187.513,34.84 191.19,34.84 J9.20@192.37,36.02
  Bottom Layer w0.152: IC4.6@180.4,36.766 180.83,36.766 181.054,36.99 181.054,37.161 181.143,37.25 185.511,37.25 185.6,37.161 v1(185.6,36.751) ; J9.20@192.37,36.02 191.27,34.92 191.27,34.794 191.359,34.705 191.485,34.705 191.722,34.942 192.817,34.942 193.676,35.802 193.676,37.441 194.676,38.441 194.927,38.441 195.016,38.53 195.016,38.726 R151.2@195.23,38.94
LVDS7_N: IC15.1 J9.24 R44.1 R248.2 | length 29.2
  Int2 (PWR) w0.152: v1(185.6,21.85) 185.517,21.767 185.517,21.49 185.428,21.401 185.302,21.401 185.072,21.631 185.072,22.069 185.701,22.698 186.651,22.698 187.9,23.947 187.9,28.427 188.949,29.476 190.318,29.476 191.251,30.409 191.251,30.851 191.34,30.94 J9.24@192.37,30.94
  Bottom Layer w0.152: IC15.1@180.4,21.814 180.83,21.814 181.054,21.59 181.054,21.42 181.143,21.33 181.389,21.33 181.409,21.351 182.377,21.351 182.466,21.44 182.466,21.456 182.68,21.67 R44.1@182.7,21.67 182.72,21.67 182.934,21.456 182.934,21.44 183.023,21.351 185.511,21.351 185.6,21.44 v1(185.6,21.85) ; J9.24@192.37,30.94 191.34,30.94 191.251,31.029 191.251,31.346 192.008,32.102 192.941,32.102 193.978,33.139 193.978,34.016 194.801,34.839 194.927,34.839 195.016,34.75 195.016,34.554 R248.2@195.23,34.34
LVDS7_P: IC15.2 J9.23 R44.2 R92.2 | length 30.5
  Int2 (PWR) w0.152: v1(185.6,20.55) 185.517,20.633 185.517,20.91 185.428,20.999 185.136,20.999 184.67,21.465 184.67,22.235 185.534,23.1 186.484,23.1 187.498,24.114 187.498,28.594 188.682,29.778 190.193,29.778 190.949,30.535 190.949,30.851 190.86,30.94 J9.23@189.83,30.94
  Bottom Layer w0.152: IC15.2@180.4,20.544 180.83,20.544 181.054,20.768 181.054,20.939 181.143,21.028 181.514,21.028 181.534,21.049 182.377,21.049 182.466,20.96 182.466,20.944 182.68,20.73 R44.2@182.7,20.73 182.72,20.73 182.934,20.944 182.934,20.96 183.023,21.049 185.511,21.049 185.6,20.96 v1(185.6,20.55) ; J9.23@189.83,30.94 190.86,30.94 190.949,31.029 190.949,31.471 191.882,32.404 192.816,32.404 193.676,33.264 193.676,34.141 194.676,35.141 194.927,35.141 195.016,35.23 195.016,35.426 R92.2@195.23,35.64
NetC1_1: C1.1 R10.2 | length 4.8
  Top Layer w0.245: C1.1@73.1,61.3 R10.2@77.896,61.3
NetC1_2: C1.2 L13.2 L17.1 T3.3 | length 31.9
  Top Layer w0.245: L17.1@55.36,81.12 55.36,77.187 L13.2@64.857,67.69 L13.2@64.624,67.923 ; L13.2@64.635,67.934 64.868,67.701 69.394,63.174 73.026,63.174 C1.2@73.1,63.1 73.12,63.12 T3.3@73.12,66.868
NetC2_2: C2.2 IC25.15 IC25.16 L7.2 R130.2 | length 5.9
  Top Layer w0.2: R130.2@37.363,24.959 v1(37.363,25.959)
  Bottom Layer w0.2: v1(37.343,21.059) 37.353,21.069 37.353,25.95 v1(37.363,25.959)
NetC4_1: C4.1 C137.2 L17.2 | length 4.1
  Top Layer w0.245: C4.1@46.7,82.496 L17.2@50.841,82.496
NetC4_2: C4.2 T1.1 | length 4.1
  Top Layer w0.245: T1.1@40.219,82.496 44.3,82.496
NetC6_2: C6.2 C29.2 L1.2 L12.2 | length 7.8
  Top Layer w0.2: L1.2@38.318,14.89 L1.2@38.373,14.945
  Top Layer w0.3: L1.2@38.373,14.945 41.793,14.945 L12.2@46.1,14.945
NetC8_2: C8.2 C39.1 R12.2 R13.1 | length 8.7
  Top Layer w0.245: C39.1@89.46,64.296 91.06,64.296 ; R13.1@89.659,66.796 91.16,66.796 ; R12.2@92.66,64.296 91.06,64.296 ; C8.2@92.66,66.796 91.16,66.796 ; 91.06,64.296 91.16,64.396 91.16,66.796
NetC11_2: C11.2 IC25.1 IC25.3 IC25.20 L12.1 | length 4.7
  Top Layer w0.3: L12.1@46.043,15.897 v1@46.043,20.634
  other v1: 45.993,20.634
NetC13_2: C13.2 C14.2 IC3.1 IC3.2 L11.2
NetC15_2: C15.2 C18.2 C23.2 C24.2 C25.1 D8.1 IC3.4 L4.2 L5.2 R42.2 | length 13.7
  Top Layer w0.2: v1(104.862,32.618) 104.862,34.584 105.687,35.41 C15.2@106.317,35.41 ; C15.2@106.32,35.413 106.758,35.426 108.632,35.426 L4.2@108.808,35.25 ; L5.2@118.608,35.25 118.758,35.4 C18.2@121.108,35.4 ; C18.2@121.095,35.37 121.838,35.37 122.66,34.548 122.66,33.24 122.557,33.137 v1(122.557,31.72)
  other v1: 142.5,16.7 143.3,16.7 144.1,16.7
NetC16_1: C16.1 R102.2 TR3.3 | length 5.6
  Top Layer w0.245: TR3.3@111.373,21.28 TR3.3@111.418,21.325 111.108,21.635 111.108,25.43 C16.1@112.408,25.43
NetC16_2: C16.2 IC7.1 | length 1.2
  Top Layer w0.2: C16.2@112.408,26.33 112.458,26.38 IC7.1@112.458,27.53
NetC17_1: C17.1 IC7.18 L4.1 | length 5.4
  Top Layer w0.2: IC7.18@112.458,31.155 IC7.18@112.458,31.43 C17.1@112.458,32.74
  Top Layer w0.245: L4.1@108.808,33.11 108.828,33.09 111.288,33.09 111.638,32.74 C17.1@112.458,32.74
NetC19_2: C19.2 R101.1 TR3.1 | length 3.9
  Top Layer w0.245: TR3.1@116.498,15.435 116.553,15.38 R101.1@118.808,15.38 118.818,15.39 C19.2@118.818,16.98
NetC20_1: C20.1 R103.2 TR3.2 | length 5.4
  Top Layer w0.245: C20.1@114.958,25.43 R103.2@116.272,25.43 ; R103.2@116.448,25.254 116.448,21.375 TR3.2@116.563,21.26
NetC20_2: C20.2 IC7.6 | length 1.2
  Top Layer w0.2: C20.2@114.958,26.33 IC7.6@114.958,27.53
NetC21_1: C21.1 IC7.13 L5.1 | length 4.3
  Top Layer w0.2: IC7.13@114.958,31.43 C21.1@114.958,32.74
  Top Layer w0.245: C21.1@114.958,32.74 115.846,32.74 116.236,33.13 117.778,33.13 L5.1@117.808,33.16
NetC26_2: C26.2 IC6.15 IC6.16 L10.2 R83.2
NetC28_2: C28.2 IC6.14 | length 2.5
  Top Layer w0.2: IC6.14@143.582,85.014 C28.2@146.1,85.014
NetC36_1: C36.1 IC5.9 | length 2.1
  Bottom Layer w0.2: C36.1@151.58,77.6 IC5.9@151.58,79.697
NetC39_2: C39.2 R11.1 R13.2 | length 5.8
  Top Layer w0.245: R11.1@84.859,65.496 86.059,64.296 C39.2@87.66,64.296 87.659,64.297 R13.2@87.659,66.796
NetC40_1: C40.1 IC20.2 R26.2 R59.1 | length 5.9
  Top Layer w0.2: 146.991,67.131 146.991,68.496
  Bottom Layer w0.2: R59.1@122.17,61.9 R26.2@122.17,59.3 122.17,57.445 IC20.2@122.21,57.405
NetC41_1: C41.1 IC20.6 R50.1 R60.2 | length 4.8
  Bottom Layer w0.2: R50.1@123.47,47.3 123.48,47.31 IC20.6@123.48,52.105
NetC52_VHF_FWD_RFD_1: C52_VHF_FWD_RFD.1 R27_VHF_FWD_RFD.2 R111_VHF_FWD_RFD.2 R113_VHF_FWD_RFD.2 | length 70.1
  Top Layer w0.245: R111_VHF_FWD_RFD.2@25.286,58.514 v1(28.836,58.514)
  Int2 (PWR) w0.245: v1(28.836,58.514) 32.951,62.629 38.678,62.629 47.069,54.239 74.639,54.239 v1(78.2,57.8)
  Bottom Layer w0.245: v1(78.2,57.8) 79.413,57.8 83.903,62.289 86.85,62.289 C52_VHF_FWD_RFD.1@86.9,62.239
NetC52_VHF_FWD_RFD_2: C52_VHF_FWD_RFD.2 IC9_VHF_FWD_RFD.1 | length 2.1
  Bottom Layer w0.2: 89.5,62.239 IC9_VHF_FWD_RFD.1@90.569,62.239
  Bottom Layer w0.245: C52_VHF_FWD_RFD.2@88.5,62.239 89.5,62.239
NetC52_VHF_REV_RFD_1: C52_VHF_REV_RFD.1 R27_VHF_REV_RFD.2 R111_VHF_REV_RFD.2 R113_VHF_REV_RFD.2 | length 71.8
  Top Layer w0.245: R111_VHF_REV_RFD.2@23.286,63.3 R113_VHF_REV_RFD.2@24.886,63.3 v1(26.086,63.3)
  Int2 (PWR) w0.245: v1(26.086,63.3) 28.2,65.414 28.2,69.364 29.336,70.5 41.8,70.5 48.8,77.5 v1(83.3,77.5)
  Bottom Layer w0.245: v1(83.3,77.5) 83.311,77.489 R27_VHF_REV_RFD.2@85.2,77.489 86.85,77.489 C52_VHF_REV_RFD.1@86.9,77.439
NetC52_VHF_REV_RFD_2: C52_VHF_REV_RFD.2 IC9_VHF_REV_RFD.1 | length 2.1
  Bottom Layer w0.2: 89.5,77.439 IC9_VHF_REV_RFD.1@90.569,77.439
  Bottom Layer w0.245: C52_VHF_REV_RFD.2@88.5,77.439 89.5,77.439
NetC53_VHF_FWD_RFD_2: C53_VHF_FWD_RFD.2 IC12_VHF_FWD_RFD.3 R24_VHF_FWD_RFD.2 | length 27.5
  Top Layer w0.2: v1(94.677,69.924) 95.8,69.924 98.024,67.7 98.839,67.7 100.439,66.1 110.355,66.1 v1(110.964,66.709)
  Bottom Layer w0.2: v1(94.677,69.924) 94.677,65.164 95.347,64.494 C53_VHF_FWD_RFD.2@95.857,64.494 R24_VHF_FWD_RFD.2@95.857,63.079 ; IC12_VHF_FWD_RFD.3@109.806,66.061 110.847,66.061 110.964,66.178 v1(110.964,66.709)